# Altium PCB MCD_Board.PcbDoc (part 1 of 2)
Units mil, origin at the board's own origin, x right, y up, seen from the top; angles counter-clockwise.
Board outline 1574.8 x 1574.8 mil, 2 copper layers (Top Layer, Bottom Layer); 91 components, 65 nets, 283 pads, 76 vias.
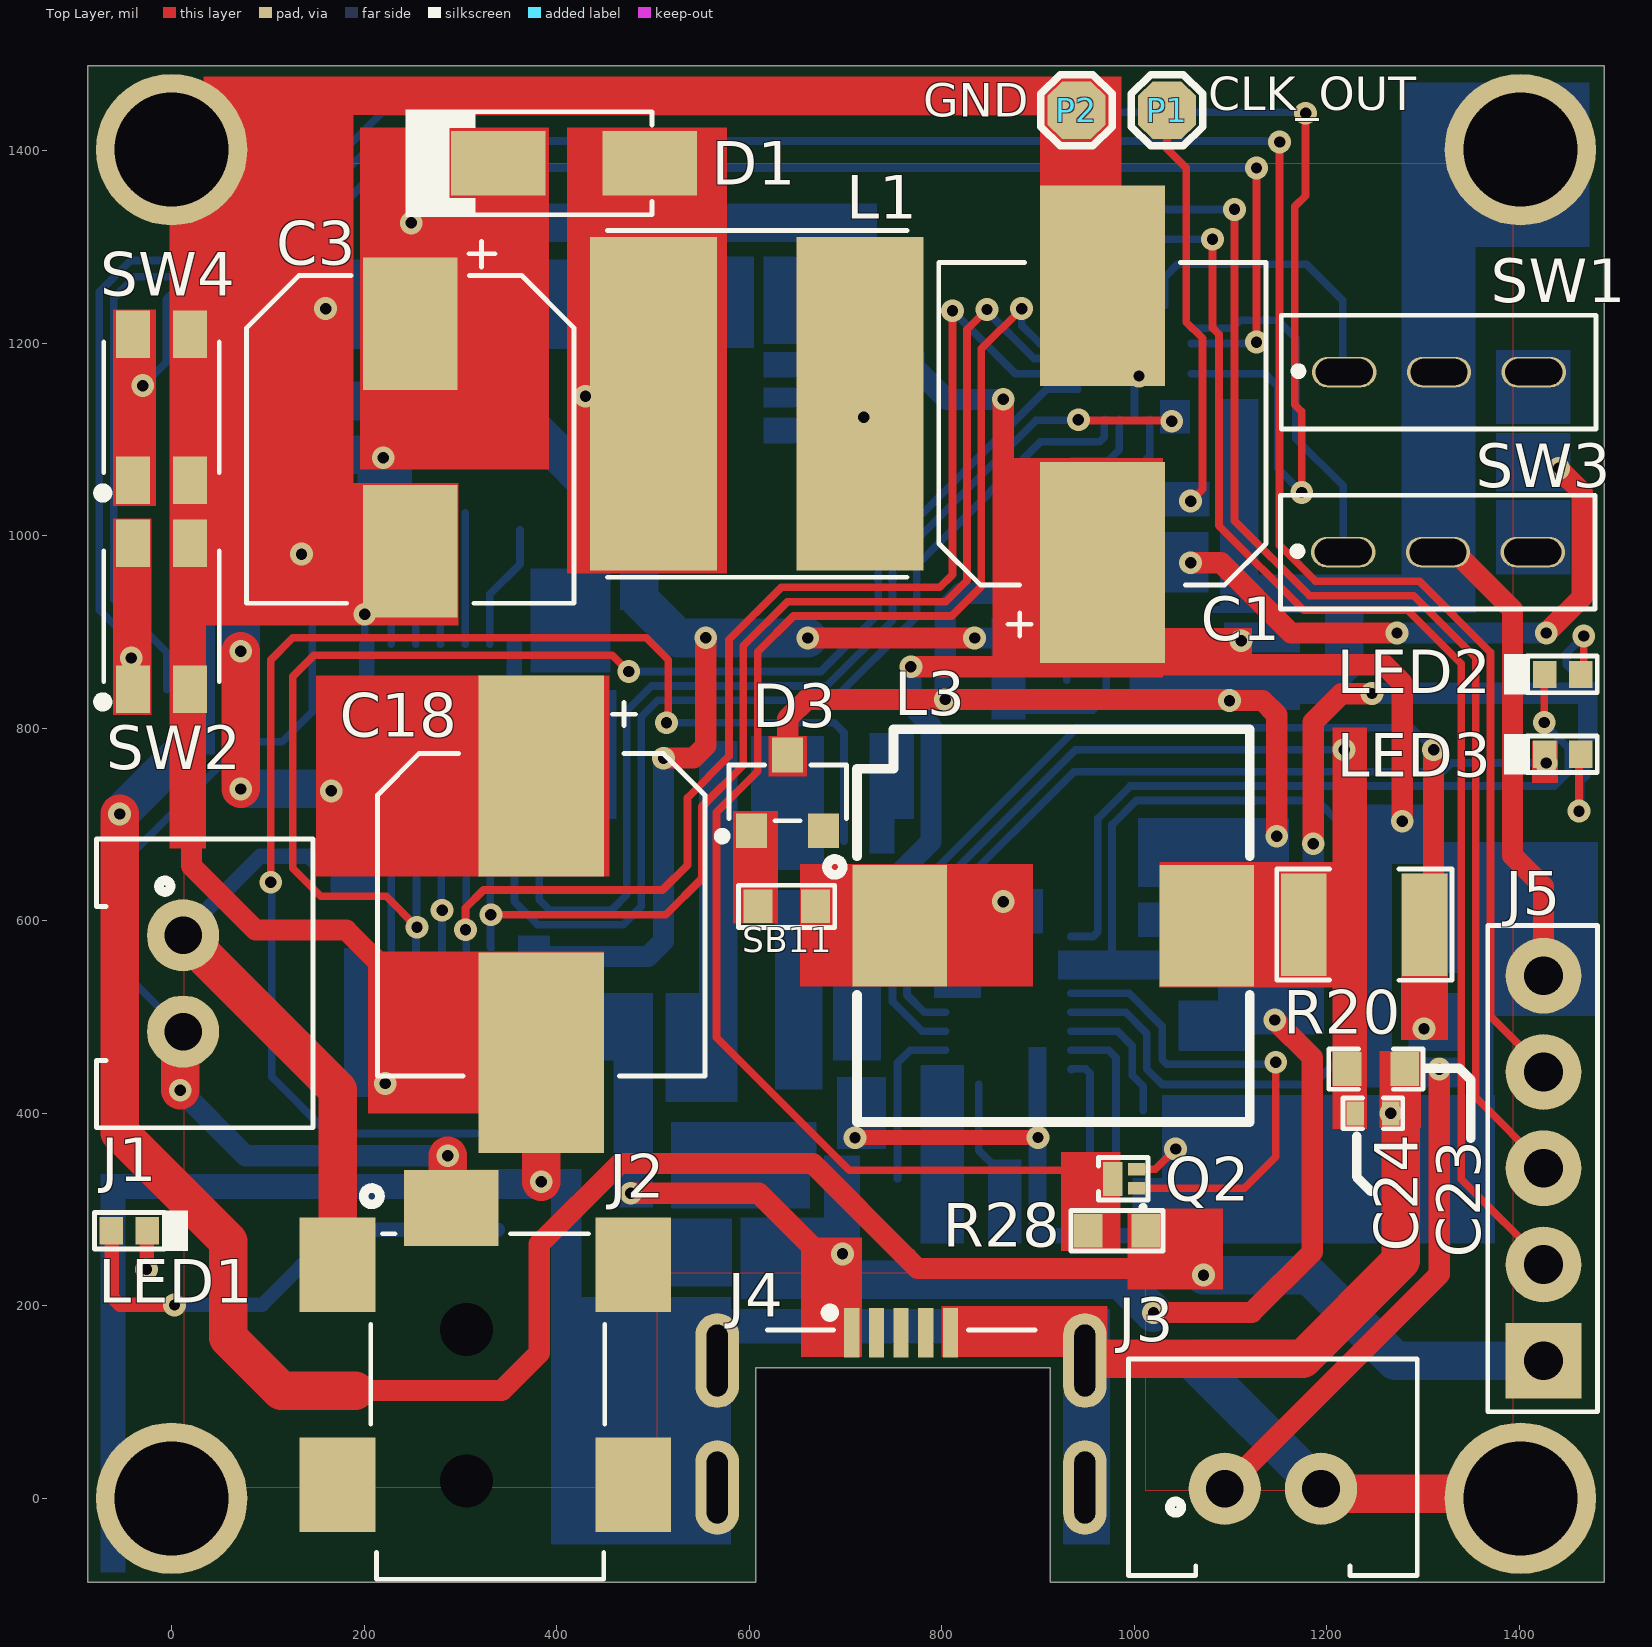
[diagram p0: Top Layer view]
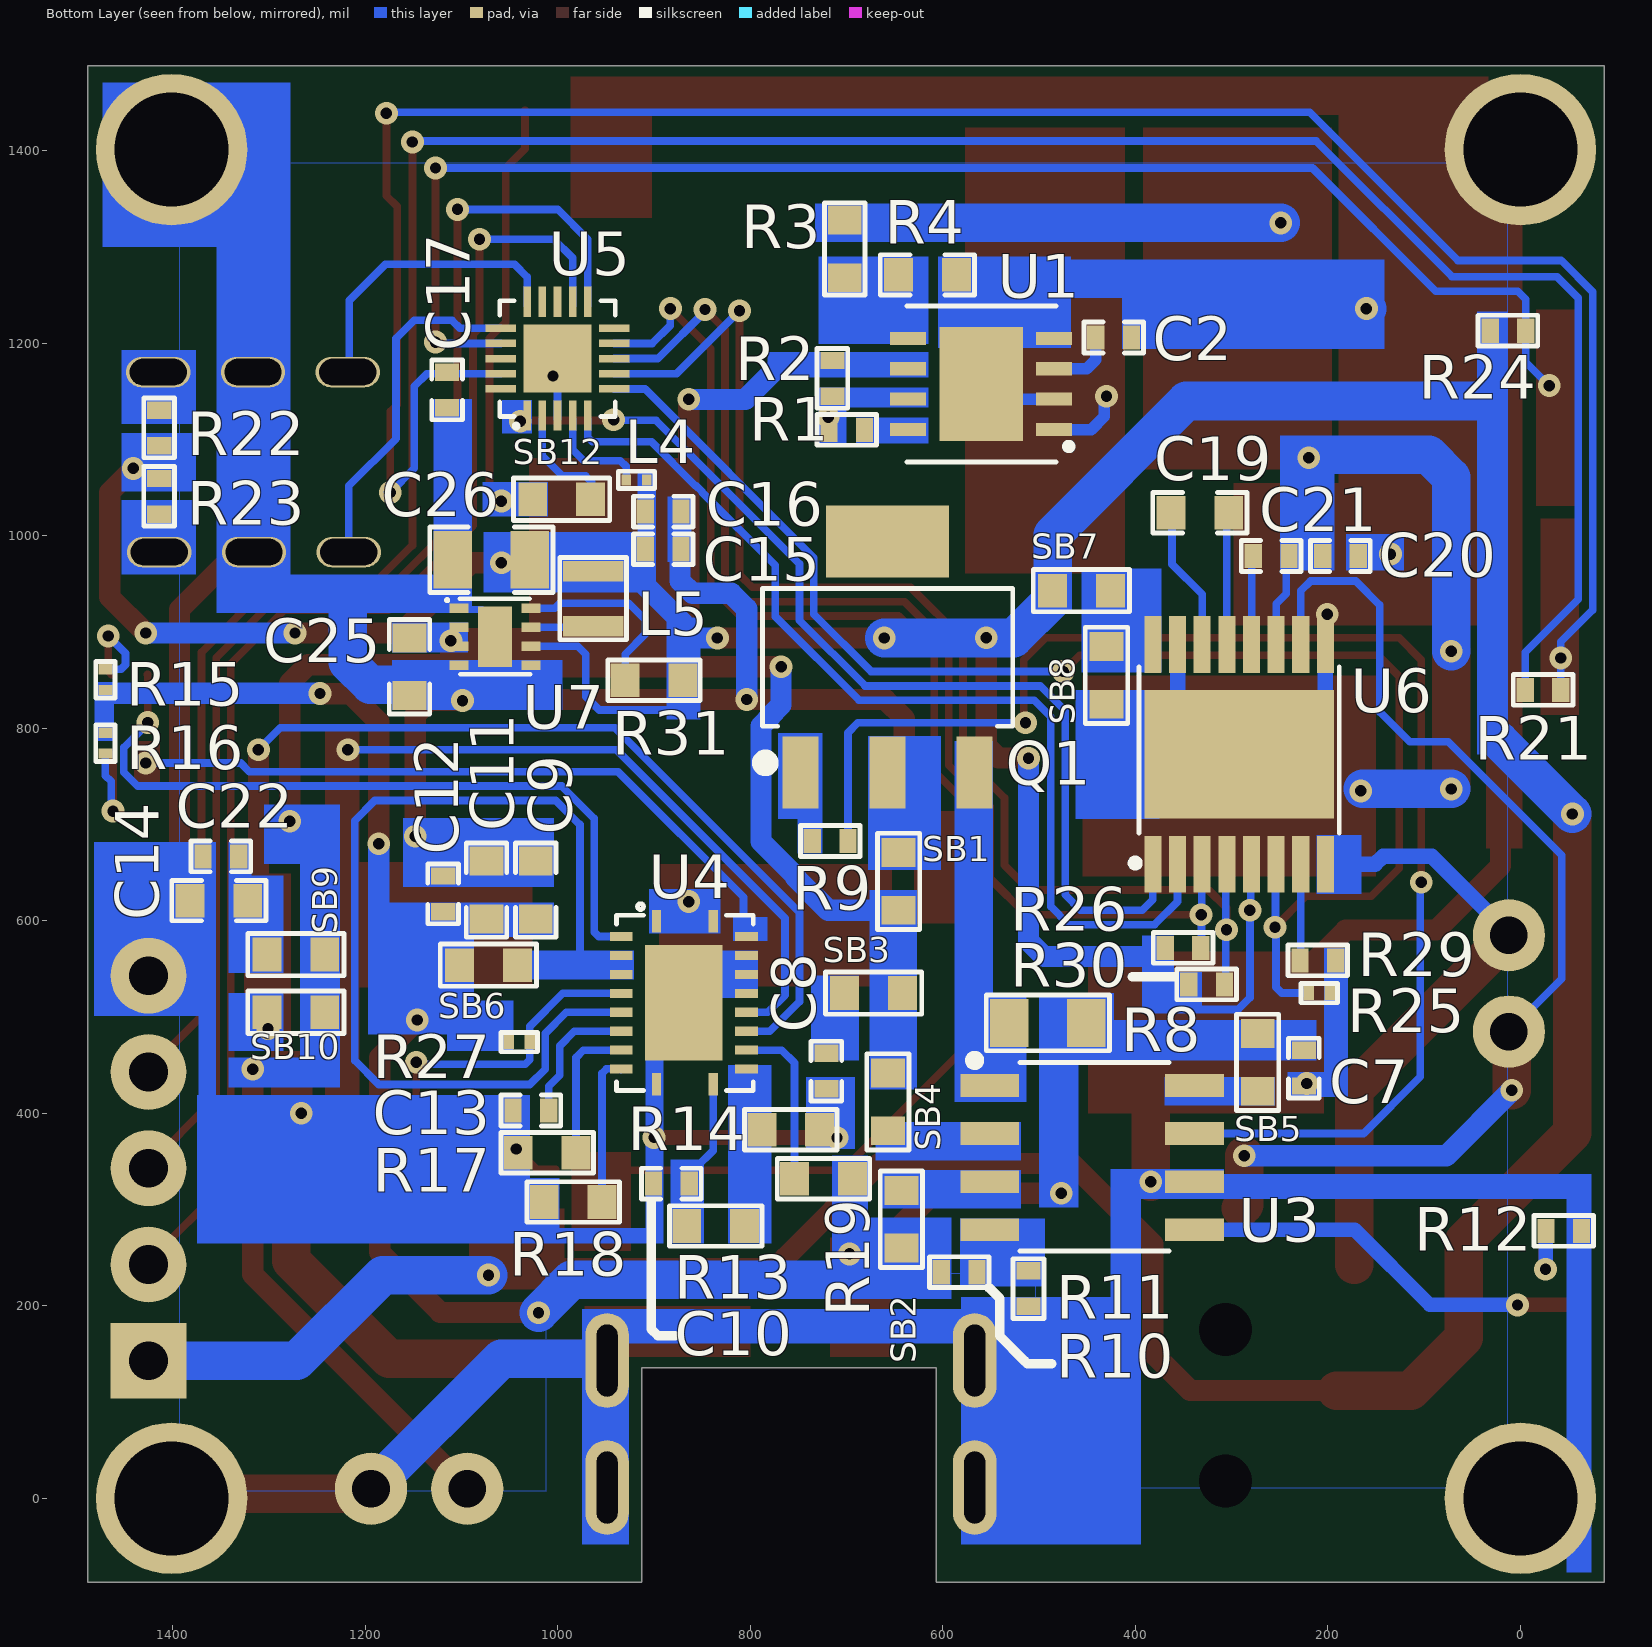
[diagram p1: Bottom Layer view, seen from below]
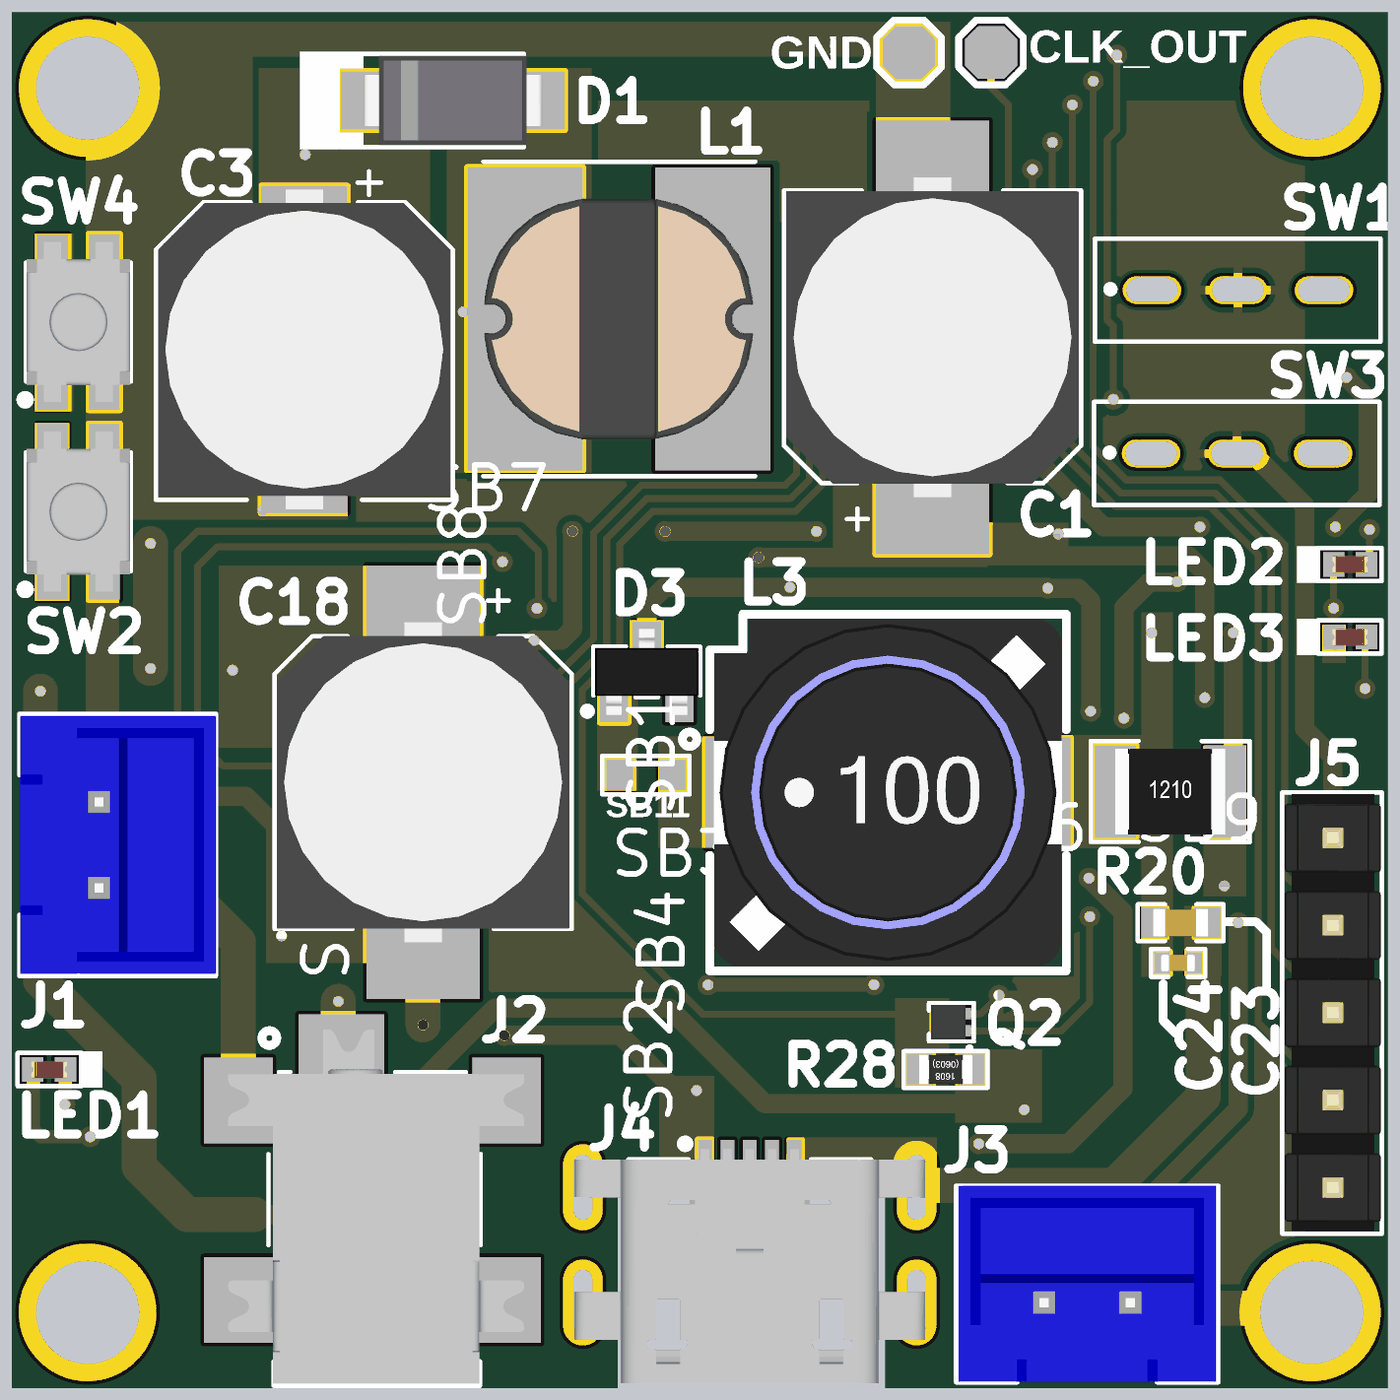
[diagram p2: 3D render of the assembled board from above, using the file's embedded part models]
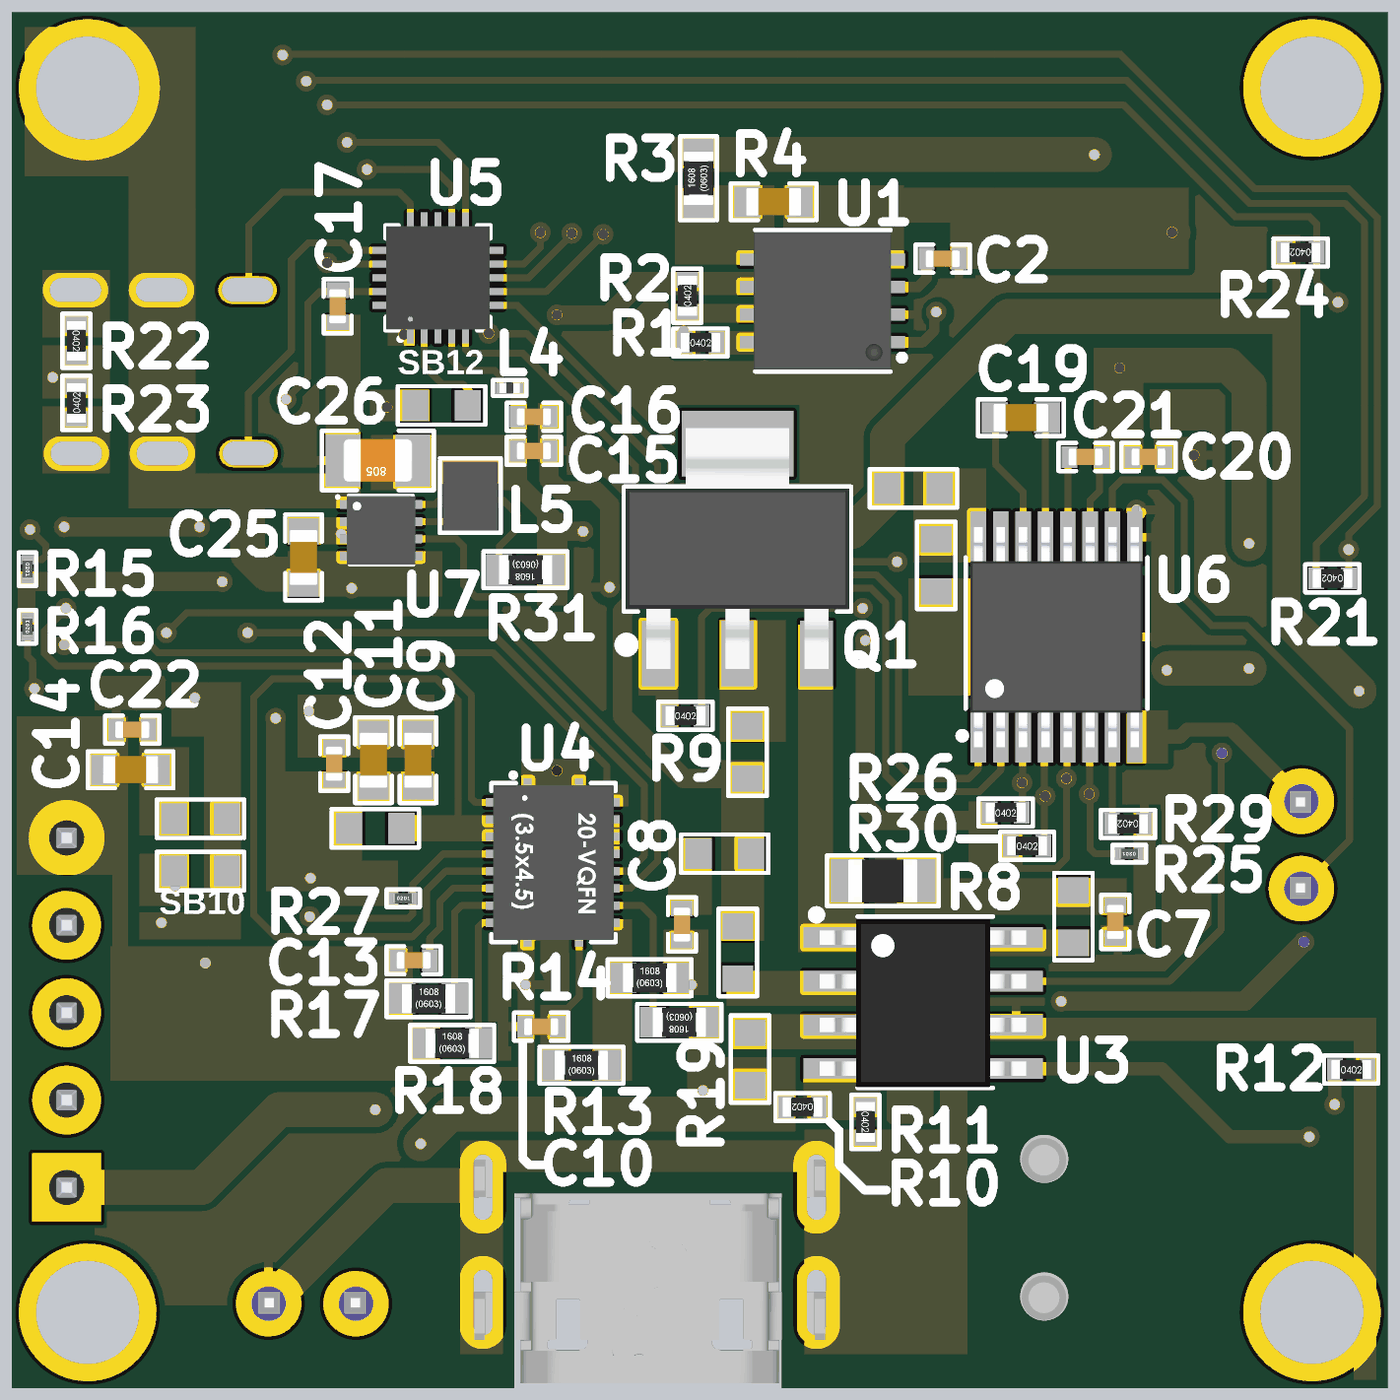
[diagram p3: 3D render of the assembled board from below, using the file's embedded part models]

## Layer stack, top to bottom
Top Solder: solder mask 0.4, Solder Resist, Dk 3.5
Top Layer: signal copper 1.4
Dielectric 1: dielectric 12.6, FR-4, Dk 4.8
Bottom Layer: signal copper 1.4
Bottom Solder: solder mask 0.4, Solder Resist, Dk 3.5

## Board outline
-86.8,-86.8 -86.8,1488 1488,1488 1488,-86.8 913,-86.8 913,136 607,136 607,-86.8

## Design rules (kind name [scope] priority, off if disabled: settings)
Clearance [All] p1: gap=7 ignorepadtopadclearanceinfootprint=FALSE except(0: Arc-Hole Track-Hole SMDPad-Hole THPad-Hole Via-Hole Fill-Hole Poly-Hole Region-Hole Text-Hole; 4: Arc-SMDPad Track-SMDPad SMDPad-SMDPad)
HoleSize [All] p1: absolutevalues=TRUE maxlimit=1000 minlimit=1 maxpercent=80.000 minpercent=20.000
HoleToHoleClearance [All] p1: gap=0 allowstackedmicrovias=TRUE
MinimumSolderMaskSliver [All] p1: minsoldermaskwidth=0
PolygonConnect [All] p1: connectstyle=Relief reliefconductorwidth=10 reliefentries=4 polygonreliefangle="90 Angle" airgapwidth=10
RoutingVias [All] p1: holewidth=11.81 width=23.62 viastyle="Through Hole" minholewidth=11.81 minwidth=23.62 maxholewidth=11.81 maxwidth=23.62
SilkToSilkClearance [All] p1: silktosilkclearance=0
SilkToSolderMaskClearance [IsPad] p1: minsilkscreentomaskgap=0 clearancetoexposedcopper=TRUE
SolderMaskExpansion [All] p1: expansion=4 istentingtop=FALSE
Width [All] p1: maxlimit=40 minlimit=8 preferedwidth=22
25 further rules are at their usual default settings.

## Classes and differential pairs
component class U_Power_Sheet: 3 C1 C2 C3 C25 C26 D1 L1 L5 R1 R2 R3 R4 R31 U1 U7
component class U_Motor_Driver_Sheet: C18 C19 C20 C21 J1 J2 R25 R26 R29 R30 SB7 SB8 U6
component class U_Controller_Sheet: 3 C15 C16 C17 L4 P1 P2 R21 R22 R23 R24 SB12 SW1 SW2 SW3 SW4 U5
component class U_Connector_Sheet: J3 J4 J5
component class U_Battery_Charging_Sheet: C7 C8 C9 C10 C11 C12 C13 C14 C22 C23 C24 D3 L3 LED1 LED2 LED3 Q1 Q2 R8 R9 R10 R11 R12 R13 R14 R15 R16 R17 R18 R19 R20 R27 R28 SB1 SB2 SB3 SB4 SB5 SB6 SB9 SB10 SB11 U3 U4

## Components (designator, comment, footprint, x,y, rotation, side; value= is the part's Value field where it differs from the comment)
C1 "100uF" UWX1E101MCL1GB 967,1116 r90 top
C2 "1500pF" "Cap 0402"#1 422.5,1206 r0 bottom
C3 "330uF" UWT1E331MNL1GS 248,1102 r270 top
C7 "0.1uF" "Cap 0402"#2 225,447 r270 bottom
C8 "0.1uF" "Cap 0402"#1 721,444 r270 bottom
C9 "10uF" "Cap 0603" 1023,632 r90 bottom
C10 "0.1uF" "Cap 0402"#1 882,327 r0 bottom
C11 "10uF" "Cap 0603" 1074,632 r90 bottom
C12 "0.1uF" "Cap 0402"#1 1119,628 r90 bottom
C13 "0.1uF" "Cap 0402"#1 1028,403 r180 bottom
C14 "10uF" "Cap 0603" 1352,621 r0 bottom
C15 "0.1uF" "Cap 0402"#1 890.5,986 r180 bottom
C16 "1uF" "Cap 0402"#1 890.5,1025 r180 bottom
C17 "0.1uF" "Cap 0402"#1 1115,1151.5 r270 bottom
C18 "100uF" UWX1E101MCL1GB 384,606.7 r270 top
C19 "22nF" "Cap 0603" 333,1024 r0 bottom
C20 "0.1uF" "Cap 0402"#1 187,979 r180 bottom
C21 "0.1uF" "Cap 0402"#1 259,979 r0 bottom
C22 "0.1uF" "Cap 0402"#1 1350,667 r0 bottom
C23 "10uF" "Cap 0603" 1251,446 r180 top
C24 "0.1uF" "Cap 0402"#2 1248,400 r180 top
C25 "10uF" "Cap 0603" 1154,864 r270 bottom
C26 "22uF" Cap0805 1069,975 r0 bottom
D1 "SS24A" SMA 418,1387 r0 top
D3 "MMBZ18VALT1G" SOT-23-3 640,733 r0 top
J1 "JST Connector" "JST Connector" 12,585 r270 top
J2 "DC-0920-SMT" DC-0920-SMT 326,158 r90 top
J3 "JST Connector" "JST Connector" 1094,10 r0 top
J4 "MU-109-ARY" MU-109-ARY 757.82,172 r0 top
J5 "PZ254V-11-05P" PZ254V-11-05P 1425.2,343 r90 top
L1 "180uH" SCD0705T-181K-N 608,1137 r0 top
L3 "10uH" SLF10145T-100M2R5-PF 916,595 r0 top
L4 "MMZ0603S601CT000" "IND 0201" 918.17,1058 r0 bottom
L5 "2.2uH" MCS20FC-2R2MMP 963,934.54 r90 bottom
LED1 "TJ-S1005SW4TGLC2R-A5" "LED 0402" -44,278 r0 top
LED2 "TJ-S1005SW4TGLC2R-A5" "LED 0402" 1444.9,856 r180 top
LED3 "TJ-S1005SW4TGLC2R-A5" "LED 0402" 1444.9,773 r180 top
P1 "TEST POINT" "TEST POINT" 1034,1442 r180 top
P2 "TEST POINT" "TEST POINT" 940,1442 r180 top
Q1 "NZT660A" NZT660A 657.45,874.08 r180 bottom
Q2 "DMN1045UFR4-7" DMN1045UFR4-7 990,332 r90 top
R1 "180R" Res0402#1 699.8,1110 r180 bottom
R2 "0.22R" Res0402#1 714.8,1163.5 r90 bottom
R3 "40K2" Res0603 702,1298 r270 bottom
R4 "2K2" "Cap 0603" 616,1271 r0 bottom
R8 "0.068R" "RES 0805" 491,494 r180 bottom
R9 "1K" Res0402#2 717,683 r180 bottom
R10 "1M" Res0402#2 583,235 r0 bottom
R11 "1M" Res0402#2 511,218 r270 bottom
R12 "2K" Res0402#1 -45,278 r180 bottom
R13 "9.31K" Res0603 836,283 r0 bottom
R14 "442K" Res0603 758,383 r0 bottom
R15 "1.5K" Res-0201 1470,850.56 r270 bottom
R16 "1.5K" Res-0201 1470,784.63 r90 bottom
R17 "5K1" Res0603 1011,359 r0 bottom
R18 "7K5" Res0603 984,308 r0 bottom
R19 "10K" Res0603 724,332 r180 bottom
R20 "0R1" "RES 1210" 1239,596 r0 top
R21 "4.7K" Res0402#1 -23.5,840 r0 bottom
R22 "10K" Res0402#2 1414,1112 r270 bottom
R23 "10K" Res0402#1 1414,1041 r90 bottom
R24 "10K" Res0402#1 13,1213 r0 bottom
R25 "1.5K" Res-0201 209,525 r0 bottom
R26 "10K" Res0402#1 350.5,572 r180 bottom
R27 "1.5K" Res-0201 1040,474 r180 bottom
R28 "10K" Res0603 982,278 r0 top
R29 "20K" Res0402#1 210.5,559 r0 bottom
R30 "10K" Res0402#1 326,534 r180 bottom
R31 "100K" Res0603 900,850 r180 bottom
SB1 "Solder Bridge" "Solder Bridge" 646,641 r270 bottom
SB2 "Solder Bridge" "Solder Bridge" 643,290 r90 bottom
SB3 "Solder Bridge" "Solder Bridge" 672,525 r0 bottom
SB4 "Solder Bridge" "Solder Bridge" 657,412 r270 bottom
SB5 "Solder Bridge" "Solder Bridge" 273,453 r270 bottom
SB6 "Solder Bridge" "Solder Bridge" 1072,554 r180 bottom
SB7 "Solder Bridge" "Solder Bridge" 456,943 r0 bottom
SB8 "Solder Bridge" "Solder Bridge" 430,855 r270 bottom
SB9 "Solder Bridge" "Solder Bridge" 1272,565 r0 bottom
SB10 "Solder Bridge" "Solder Bridge" 1272,505 r180 bottom
SB11 "Solder Bridge" "Solder Bridge" 639,615 r180 top
SB12 "Solder Bridge" "Solder Bridge" 996,1038 r0 bottom
SW1 "DS037-00P-60" DS037-00P-60 1316.57,1170 r0 top
SW2 "TS-1185EC-C-D-B" TS-1185EC-C-D-B -10.47,916.41 r90 top
SW3 "DS037-00P-60" DS037-00P-60 1315.57,983 r0 top
SW4 "TS-1185EC-C-D-B" TS-1185EC-C-D-B -10.47,1133.41 r90 top
U1 "MC33063ADRJR" MC33063ADRJR 560.21,1157.75 r0 bottom
U3 "BQ2057WSNTR" BQ2057WSNTR 445,354 r180 bottom
U4 "BQ24103ARHLR" BQ24103ARHLR 869.04,514.84 r180 bottom
U5 "ATTINY1616-MNR" 20-QFN 1000.25,1184.06 r90 bottom
U6 "DRV8876PWPR" 16HTSSOP 292.2,773 r90 bottom
U7 "TPS62162DSGR" "8-WSON (2x2)" 1065.4,895.16 r180 bottom

## Footprints (in the part's own frame and the unit in brackets; to place one, negate y for a bottom-side part, rotate by r counter-clockwise, add the part's x,y. Pads: shape width x height; smd on the part's side, far side on the other; paste and mask are expansions set on the pad)
"8-WSON (2x2)" [mm] "IC REG BUCK 3.3V 1A 8WSON"
  rect 0.5x0.25 smd: 1(-0.95,0.75) 2(-0.95,0.25) 3(-0.95,-0.25) 4(-0.95,-0.75) 5(0.95,-0.75) 6(0.95,-0.25) 7(0.95,0.25) 8(0.95,0.75)
  rect 0.9x1.6 smd: 9(0,0)
  silkscreen extent -1.28,-0.99 0.93,1, body extent -1,-1 1,1, height 0.8
16HTSSOP [mm]
  rect 1.5x0.45 smd: 1(-2.9,2.275) 2(-2.9,1.625) 3(-2.9,0.975) 4(-2.9,0.325) 5(-2.9,-0.325) 6(-2.9,-0.975) 7(-2.9,-1.625) 8(-2.9,-2.275) 9(2.9,-2.275) 10(2.9,-1.625) 11(2.9,-0.975) 12(2.9,-0.325) 13(2.9,0.325) 14(2.9,0.975) 15(2.9,1.625) 16(2.9,2.275)
  rect 3.4x5 smd: 17(0,0)
  silkscreen extent -2.94,-2.64 2.31,2.82, body extent -3.2,-2.5 3.2,2.5, height 1.2
20-QFN [mm] "IC MCU 8BIT 16KB FLASH 20VQFN"
  rect 0.8x0.2 smd: 1(-1.5,0.8) 2(-1.5,0.4) 3(-1.5,0) 4(-1.5,-0.4) 5(-1.5,-0.8) 11(1.5,-0.8) 12(1.5,-0.4) 13(1.5,0) 14(1.5,0.4) 15(1.5,0.8)
  rect 0.2x0.8 smd: 6(-0.8,-1.5) 7(-0.4,-1.5) 8(0,-1.5) 9(0.4,-1.5) 10(0.8,-1.5) 16(0.8,1.5) 17(0.4,1.5) 18(0,1.5) 19(-0.4,1.5) 20(-0.8,1.5)
  rect 1.8x1.8 smd: 21(0,0)
  silkscreen extent -1.83,-1.52 1.52,1.52, body extent -1.5,-1.5 1.5,1.5, height 0.59
BQ2057WSNTR [mm]
  rect 1.55x0.6 smd: 1(-2.7,1.905) 2(-2.7,0.635) 3(-2.7,-0.635) 4(-2.7,-1.905) 5(2.7,-1.905) 6(2.7,-0.635) 7(2.7,0.635) 8(2.7,1.905)
  silkscreen extent -3.23,-2.46 2.03,2.69, body extent -3,-2.45 3,2.45, height 1.65
BQ24103ARHLR [mm]
  rect 0.24x0.6 smd: 1(-0.725,2.15) 10(-0.725,-2.15) 11(0.775,-2.15) 20(0.775,2.15)
  rect 0.6x0.24 smd: 2(-1.65,1.75) 3(-1.65,1.25) 4(-1.65,0.75) 5(-1.65,0.25) 6(-1.65,-0.25) 7(-1.65,-0.75) 8(-1.65,-1.25) 9(-1.65,-1.75) 12(1.65,-1.75) 13(1.65,-1.25) 14(1.65,-0.75) 15(1.65,-0.25) 16(1.65,0.25) 17(1.65,0.75) 18(1.65,1.25) 19(1.65,1.75)
  rect 2.05x3.05 smd: 21(0,0)
  silkscreen extent -1.78,-2.31 1.83,2.62, body extent -1.73,-2.26 1.79,2.26, height 0.88
Cap0805 [mil] "SMD 0805"
  rect 40x60 smd mask+2.76: 1(-40,0) 2(40,0)
  silkscreen extent -64,-34 64,34, body extent -39,-25 39,25, height 30
"Cap 0402"#1 [mil]
  rect 18x25 smd mask+2.36: 1(-18.5,0) 2(18.5,0)
  silkscreen extent -31,-16 31,16, body extent -20,-10 20,10, height 19
"Cap 0402"#2 [mil]
  rect 18x25 smd: 1(-18.5,0) 2(18.5,0)
  silkscreen extent -31,-16 31,16, body extent -20,-10 20,10, height 19
"Cap 0603" [mil]
  rect 30x35 smd mask+2.36: 1(-30,0) 2(30,0)
  silkscreen extent -49,-21 49,21, body extent -32,-16 31,16, height 34
DC-0920-SMT [mm]
  rect 2.5x2 smd: 1(2.15,3.9) 2(2.15,-3.9) 4(-3.65,3.9) 5(-3.65,-3.9)
  rect 2x2.5 smd: 3(3.65,0.9)
  round 0 hole 1.4 unplated: 7(0.45,0.5) 8(-3.55,0.5)
  silkscreen extent -6.15,-3.15 4.18,3.21, body extent -6.09,-4.41 4.21,4.19, height 4.8
DMN1045UFR4-7 [mm]
  rect 0.33x0.445 smd: 1(-0.25,-0.312) 2(0.25,-0.312)
  rect 0.9x0.505 smd: 3(0,0.313)
  Top Layer region: -0.174,0.551 0.156,0.551 0.156,0.751 -0.174,0.751
  silkscreen extent -0.81,-0.62 0.56,0.69, body extent -0.5,-0.37 0.5,0.63, height 0.37
DS037-00P-60 [mm]
  oval 1.7x0.8 hole 0.7 slot 1.5 at 0 deg: 1(-2.5,0) 2(0,0) 3(2.5,0)
  silkscreen extent -4.16,-1.5 4.14,1.5
"IND 0201" [mm]
  rect 0.25x0.3 smd mask+0.055: 1(-0.275,0) 2(0.275,0)
  silkscreen extent -0.48,-0.23 0.48,0.23, body extent -0.3,-0.15 0.3,0.15, height 0.15
"JST Connector" [mil] "2 Pin JST Connector"
  round 75 hole 39: 1(0,0) 2(100,0)
  silkscreen extent -100,-90 200,135, body extent -98,-89 198,135, height 284
"LED 0402" [mm]
  rect 0.62x0.72 smd: 1(-0.475,0) 2(0.475,0)
  silkscreen extent -0.91,-0.53 1.55,0.53, body extent -0.5,-0.25 0.51,0.25, height 0.45
MC33063ADRJR [mm]
  rect 0.95x0.35 smd: 1(-1.925,1.2) 1(-1.925,1.2) 2(-1.925,0.4) 3(-1.925,-0.4) 4(-1.925,-1.2) 5(1.925,-1.2) 6(1.925,-0.4) 7(1.925,0.4) 8(1.925,1.2)
  rect 2.2x3 smd: 9(0,0)
  silkscreen extent -2.36,-2.06 1.96,2.06, body extent -2,-2 2,2, height 0.85
MCS20FC-2R2MMP [mm] "IND SMD 2.2uH 1.5A"
  rect 0.55x1.6 smd: 1(-0.725,0) 2(0.725,0)
  silkscreen extent -1.08,-0.88 1.09,0.89, body extent -1,-0.8 1,0.8, height 1
MU-109-ARY [mm]
  rect 0.4x1.3 smd: 1(-1.3,0) 2(-0.65,0) 3(0,0) 4(0.65,0) 5(1.3,0)
  oval 1.15x2.5 hole 0.55 slot 1.9 at 90 deg: MH1(-4.85,-0.73) MH2(-4.85,-4.08) MH3(4.85,-4.08) MH4(4.85,-0.73)
  Top Layer pour cut-out: -3.886,-0.838 -3.886,-6.426 3.886,-6.426 3.886,-0.838
  silkscreen extent -3.53,0.08 3.53,0.65, body extent -5.1,-6.43 5.1,0.38, height 1.81
NZT660A [mm]
  rect 0.95x1.9 smd: 1(-2.3,-3.05) 2(0,-3.05) 3(2.3,-3.05)
  rect 3.25x1.9 smd: 4(0,3.05)
  silkscreen extent -3.33,-2.9 3.3,1.8, body extent -3.25,-3.5 3.25,3.5, height 1.61
PZ254V-11-05P [mm] "Through Hole,P=2.54mm"
  rect 2x2 hole 1.02: 1(-5.08,0)
  round 2 hole 1.02: 2(-2.54,0) 3(0,0) 4(2.54,0) 5(5.08,0)
  silkscreen extent -6.43,-1.42 6.4,1.47, body extent -6.35,-1.4 6.35,1.4, height 8.5
Res0402#1 [mil]
  rect 18x25 smd mask+4: 1(-18.5,0) 2(18.5,0)
  silkscreen extent -32,-17 32,16, body extent -23,-11 23,11, height 16
Res0402#2 [mil]
  rect 18x25 smd: 1(-18.5,0) 2(18.5,0)
  silkscreen extent -32,-17 32,16, body extent -23,-11 23,11, height 16
Res0603 [mil]
  rect 30x35 smd: 1(-30,0) 2(30,0)
  silkscreen extent -48,-21 48,21, body extent -31,-17 31,17, height 18
"RES 0805" [mil] "SMD 0805"
  rect 40x50 smd: 1(-40,0) 2(40,0)
  silkscreen extent -64,-29 64,29, body extent -39,-25 39,24, height 24
"RES 1210" [mm]
  rect 1.2x2.7 smd: 1(-1.6,0) 2(1.6,0)
  silkscreen extent -2.31,-1.47 2.31,1.47, body extent -1.6,-1.25 1.6,1.25, height 0.6
Res-0201 [mm]
  rect 0.27x0.37 smd: 1(-0.275,0) 2(0.275,0)
  silkscreen extent -0.48,-0.25 0.48,0.25, body extent -0.3,-0.15 0.3,0.15, height 0.29
SCD0705T-181K-N [mm]
  rect 3.35x8.8 smd: 1(-2.725,0) 2(2.725,0)
  silkscreen extent -3.94,-4.57 3.96,4.57, body extent -3.92,-3.5 3.91,3.5, height 5.1
SLF10145T-100M2R5-PF [mm]
  rect 2.5x3.2 smd: 1(-4.05,0) 2(4.05,0)
  silkscreen extent -5.97,-5.18 5.18,5.18, body extent -5.06,-5.05 5.06,5.05, height 4.5
SMA [mm]
  rect 2.5x1.7 smd: 1(-2,0) 2(2,0)
  silkscreen extent -4.45,-1.42 2.06,1.42, body extent -2.6,-1.3 2.6,1.3, height 2.4
"Solder Bridge" [mil] "Solder Bridge ON"
  rect 30x35 smd: 1(-30,0) 2(30,0)
  silkscreen extent -50,-22 50,22
SOT-23-3 [mm] "TRANS NPN 40V 0.6A SOT23"
  rect 0.82x0.92 smd: 1(-0.95,-1) 2(0.95,-1) 3(0,1)
  silkscreen extent -1.82,-1.23 1.55,0.74, body extent -1.5,-1.25 1.5,1.25, height 1.1
"TEST POINT" [mil]
  oct 60x60 smd: 1(0,0)
  silkscreen extent -37,-37 37,37
TS-1185EC-C-D-B [mm]
  rect 1.25x0.9 smd: 1(-1.925,0.75) 1(1.925,0.75) 2(-1.925,-0.75) 2(1.925,-0.75)
  silkscreen extent -2.39,-1.52 1.73,1.68, body extent -2.33,-1.5 2.32,1.5, height 2
UWT1E331MNL1GS [mm]
  rect 3.5x2.5 smd: 1(-3,0) 2(3,0)
  silkscreen extent -5.18,-4.32 4.37,4.32, body extent -4.65,-4.25 4.65,4.25, height 10.34
UWX1E101MCL1GB [mm]
  rect 5.3x3.3 smd: 1(-3.65,0) 2(3.65,0)
  silkscreen extent -5.59,-4.32 4.27,4.32, body extent -4.65,-4.25 4.65,4.25, height 10.34

## Part data
C1 C18: library part UWX1E101MCL1GB, "CAP ALUM 100UF 20% 25V SMD", Case/Package=Radial, Dielectric Material=Aluminium, Leakage Current=3uA, Manufacturer=Nichicon, Max Operating Temperature=85°C, Min Operating Temperature=-40°C, Package Quantity=1000, Ripple Current=110mA, Supplier Part Number 1=493-2113-6-ND, Tolerance=20%, Voltage=25V, Capacitance=100uF, Category="Aluminum Electrolytic Capacitors", ComponentLink1Description=http://nichicon-us.com/english/products/pdfs/e-uwx.pdf?src-supplier=Digi-Key, ComponentLink1URL=http://nichicon-us.com/english/products/pdfs/e-uwx.pdf?src-supplier=Digi-Key, ComponentLink2Description=http://www.nichicon.co.jp/english/products/pdfs/e-ch_ref.pdf?src-supplier=Mouser, ComponentLink2URL=http://www.nichicon.co.jp/english/products/pdfs/e-ch_ref.pdf?src-supplier=Mouser, ComponentLink3Description=http://www.nichicon.co.jp/english/products/pdfs/e-wx.pdf?src-supplier=Avnet, ComponentLink3URL=http://www.nichicon.co.jp/english/products/pdfs/e-wx.pdf?src-supplier=Avnet, ComponentLink4Description=http://uk.rs-online.com/webdocs/0fa3/0900766b80fa3a90.pdf?src-supplier=RSComponents, ComponentLink4URL=http://uk.rs-online.com/webdocs/0fa3/0900766b80fa3a90.pdf?src-supplier=RSComponents, ComponentLink5Description=http://nichicon-us.com/english/products/pdfs/e-wx.pdf?src-supplier=Future+Electronics, ComponentLink5URL=http://nichicon-us.com/english/products/pdfs/e-wx.pdf?src-supplier=Future+Electronics, ComponentLink6Description=http://www.nichicon.co.jp/english/products/pdfs/e-ch_ref.pdf?src-supplier=Avnet+Europe, ComponentLink6URL=http://www.nichicon.co.jp/english/products/pdfs/e-ch_ref.pdf?src-supplier=Avnet+Europe, ComponentLink7Description=http://www.farnell.com/datasheets/2364658.pdf?src-supplier=Element14, ComponentLink7URL=http://www.farnell.com/datasheets/2364658.pdf?src-supplier=Element14, ComponentLink8Description=https://datasheet.ciiva.com/11778/0900766b80fa3a90-11778418.pdf?src-supplier=RSComponents, ComponentLink8URL=https://datasheet.ciiva.com/11778/0900766b80fa3a90-11778418.pdf?src-supplier=RSComponents, ComponentLink9Description=https://datasheet.ciiva.com/17527/e-wx-17527624.pdf?src-supplier=Avnet+Europe, ComponentLink9URL=https://datasheet.ciiva.com/17527/e-wx-17527624.pdf?src-supplier=Avnet+Europe, ComponentLink10Description=https://datasheet.ciiva.com/5361/e-wx-11809-5361100.pdf?src-supplier=Mouser, ComponentLink10URL=https://datasheet.ciiva.com/5361/e-wx-11809-5361100.pdf?src-supplier=Mouser, ComponentLink11Description=https://datasheet.ciiva.com/28458/1912851-28458684.pdf?src-supplier=Element14, ComponentLink11URL=https://datasheet.ciiva.com/28458/1912851-28458684.pdf?src-supplier=Element14, ComponentLink12Description=https://datasheet.ciiva.com/96/e-wx-96650.pdf?src-supplier=Digi-Key, ComponentLink12URL=https://datasheet.ciiva.com/96/e-wx-96650.pdf?src-supplier=Digi-Key, ComponentLink13Description=https://datasheet.ciiva.com/96/e-wx-96651.pdf?src-supplier=Digi-Key, ComponentLink13URL=https://datasheet.ciiva.com/96/e-wx-96651.pdf?src-supplier=Digi-Key, ComponentLink14Description=https://datasheet.ciiva.com/96/e-wx-96652.pdf?src-supplier=Digi-Key, ComponentLink14URL=https://datasheet.ciiva.com/96/e-wx-96652.pdf?src-supplier=Digi-Key, ComponentLink15Description=https://datasheet.ciiva.com/11687/e-wx-11687148.pdf?src-supplier=Avnet, ComponentLink15URL=https://datasheet.ciiva.com/11687/e-wx-11687148.pdf?src-supplier=Avnet, ComponentLink16Description=https://datasheet.ciiva.com/16512/e-wx-16512638.pdf?src-supplier=Future+Electronics, ComponentLink16URL=https://datasheet.ciiva.com/16512/e-wx-16512638.pdf?src-supplier=Future+Electronics, Construction=Cylindrical, Diameter=8mm, Dissipation Factor=0.14%, Height=5.4mm, Height - Seated (Max)=0.213inch, Lead Diameter=0.8mm, Lead Free="Lead Free", Lead Pitch=2.3mm, Length=5.4mm, Life (Hours)=2000Hour, Manufacturer Part Number=UWX1E101MCL1GB, Mount="Surface Mount", Number of Pins=2, Packaging="Tape and Reel", Polarity=Polar, Pricing 1="1=0.43, 10=0.301, 50=0.211, 100=0.1808, 500=0.13558 (USD)", Pricing 2="1=0.43000, 10=0.30100, 50=0.21100, 100=0.18080, 500=0.13558 (USD)", Radiation Hardening=No, REACH SVHC="No SVHC", Ripple Current (AC)=110mA, RoHS=Yes, RoHS Compliant=Yes, Series=WX, Stock 1=30613, Stock 2=25010, Supplier 1=Digi-Key, Supplier 2=Digi-Key, Supplier Part Number 2=493-2113-1-ND, Termination=SMD/SMT, Voltage Rating=25V, Voltage Rating (DC)=25V, Weight=0.01lb, Width=0.25inch
C2: library part CL05B152KB5NNNC, "CAP CER 1500PF 50V X7R 0402", Capacitance=1.5nF, Case Code (Imperial)=0402, Case Code (Metric)=1005, Dielectric=X7R, Manufacturer=Samsung, Max Operating Temperature=125°C, Min Operating Temperature=-55°C, Package Quantity=1, Supplier Part Number 1=7661526, Tolerance=10%, Voltage=50V, Case/Package=0402, Category="Ceramic Capacitors", ComponentLink1Description=https://datasheet.ciiva.com/16498/cl05b152kb5nnnc-16498493.pdf?src-supplier=Future+Electronics, ComponentLink1URL=https://datasheet.ciiva.com/16498/cl05b152kb5nnnc-16498493.pdf?src-supplier=Future+Electronics, ComponentLink2Description=https://datasheet.ciiva.com/15195/getdatasheetpartid-543173-15195639.pdf?src-supplier=Verical, ComponentLink2URL=https://datasheet.ciiva.com/15195/getdatasheetpartid-543173-15195639.pdf?src-supplier=Verical, ComponentLink3Description=https://datasheet.ciiva.com/29198/459134-da-01-en-vs-kondensator-0402-29198336.pdf?src-supplier=Conrad, ComponentLink3URL=https://datasheet.ciiva.com/29198/459134-da-01-en-vs-kondensator-0402-29198336.pdf?src-supplier=Conrad, ComponentLink4Description=https://datasheet.ciiva.com/26309/mlcc-catalogdownload2013-eng-26309021.pdf?src-supplier=Distrelec, ComponentLink4URL=https://datasheet.ciiva.com/26309/mlcc-catalogdownload2013-eng-26309021.pdf?src-supplier=Distrelec, Construction=Flat, Contact Plating=Tin, Depth=0.5mm, Height=0.5mm, Length=1mm, Manufacturer Part Number=CL05B152KB5NNNC, Material=Ceramic, Mount="Surface Mount", Packaging="Tape and Reel", Pricing 1="10000=0.00400, 30000=0.00400, 50000=0.00400, 100000=0.00300, 250000=0.00300 (USD)", Radiation Hardening=No, RoHS=Yes, RoHS Compliant=Yes, Series=CL, Stock 1=20000, Supplier 1=RSComponents, Thickness=0.022inch, Voltage Rating=50V, Width=0.02inch
C3: library part UWT1E331MNL1GS, "CAP ALUM 330UF 20% 25V SMD", Case/Package=Radial, Dielectric Material=Aluminium, Leakage Current=3uA, Manufacturer=Nichicon, Max Operating Temperature=105°C, Min Operating Temperature=-55°C, Package Quantity=500, Ripple Current=190mA, Supplier Part Number 1=58R3568, Tolerance=20%, Voltage=25V, Capacitance=330uF, Category="Aluminum Electrolytic Capacitors", ComponentLink1Description=https://datasheet.ciiva.com/97/e-wt-97107.pdf?src-supplier=Digi-Key, ComponentLink1URL=https://datasheet.ciiva.com/97/e-wt-97107.pdf?src-supplier=Digi-Key, ComponentLink2Description=https://datasheet.ciiva.com/30522/getdatasheetpartid-457641-30522227.pdf?src-supplier=Verical, ComponentLink2URL=https://datasheet.ciiva.com/30522/getdatasheetpartid-457641-30522227.pdf?src-supplier=Verical, ComponentLink3Description=https://datasheet.ciiva.com/97/e-wt-97108.pdf?src-supplier=Digi-Key, ComponentLink3URL=https://datasheet.ciiva.com/97/e-wt-97108.pdf?src-supplier=Digi-Key, ComponentLink4Description=https://datasheet.ciiva.com/97/e-wt-97109.pdf?src-supplier=Digi-Key, ComponentLink4URL=https://datasheet.ciiva.com/97/e-wt-97109.pdf?src-supplier=Digi-Key, ComponentLink5Description=https://datasheet.ciiva.com/11782/0900766b80649b51-11782007.pdf?src-supplier=RSComponents, ComponentLink5URL=https://datasheet.ciiva.com/11782/0900766b80649b51-11782007.pdf?src-supplier=RSComponents, ComponentLink6Description=https://datasheet.ciiva.com/11686/e-wt-11686502.pdf?src-supplier=Avnet, ComponentLink6URL=https://datasheet.ciiva.com/11686/e-wt-11686502.pdf?src-supplier=Avnet, ComponentLink7Description=https://datasheet.ciiva.com/16502/e-wt-16502936.pdf?src-supplier=Future+Electronics, ComponentLink7URL=https://datasheet.ciiva.com/16502/e-wt-16502936.pdf?src-supplier=Future+Electronics, ComponentLink8Description=https://datasheet.ciiva.com/7851/e-wt-7851757.pdf?src-supplier=Element14, ComponentLink8URL=https://datasheet.ciiva.com/7851/e-wt-7851757.pdf?src-supplier=Element14, Construction=Cylindrical, Diameter=8mm, Dissipation Factor=0.16%, Height=10mm, Height - Seated (Max)=0.394inch, Lead Free="Lead Free", Length=10mm, Life (Hours)=1000Hour, Manufacturer Part Number=UWT1E331MNL1GS, Mount="Surface Mount,PCB", Number of Pins=2, Packaging="Tape and Reel", Pricing 1="1=0.75000, 10=0.53800, 25=0.47600, 50=0.41500, 100=0.35400 (USD)", Radiation Hardening=No, REACH SVHC="No SVHC", Ripple Current (AC)=190mA, RoHS=Yes, RoHS Compliant=Yes, Series=WT, Supplier 1=Newark, Termination=SMD/SMT, Voltage Rating=25V, Voltage Rating (DC)=25V
C7 C8 C10 C12 C13 C15 C17 C20 C21 C22 C24: library part CC0402KRX7R7BB104, "CAP CER 0.1UF 16V X7R 0402", Capacitance=100nF, Case Code (Imperial)=0402, Case Code (Metric)=1005, Dielectric=X7R, Manufacturer=Yageo, Max Operating Temperature=125°C, Min Operating Temperature=-55°C, Package Quantity=1, Supplier Part Number 1=311-1338-1-ND, Tolerance=10%, Voltage=16V, Case/Package=0402, ComponentLink1Description=http://www.yageo.com/documents/recent/UPY-GPHC_X7R_6.3V-to-50V_8.pdf?src-supplier=Avnet+Europe, ComponentLink1URL=http://www.yageo.com/documents/recent/UPY-GPHC_X7R_6.3V-to-50V_8.pdf?src-supplier=Avnet+Europe, ComponentLink2Description=http://www.yageo.com/documents/recent/UPY-GPHC_X7R_6.3V-to-50V_18.pdf?src-supplier=Digi-Key, ComponentLink2URL=http://www.yageo.com/documents/recent/UPY-GPHC_X7R_6.3V-to-50V_18.pdf?src-supplier=Digi-Key, ComponentLink3Description=http://www.yageo.com/documents/recent/UPY-GPHC_X7R_6.3V-to-50V_8.pdf?src-supplier=Avnet, ComponentLink3URL=http://www.yageo.com/documents/recent/UPY-GPHC_X7R_6.3V-to-50V_8.pdf?src-supplier=Avnet, ComponentLink4Description=http://www.yageo.com/documents/recent/UPY-GPHC_X7R_6.3V-to-50V_18.pdf?src-supplier=Mouser, ComponentLink4URL=http://www.yageo.com/documents/recent/UPY-GPHC_X7R_6.3V-to-50V_18.pdf?src-supplier=Mouser, ComponentLink5Description=http://www.farnell.com/datasheets/2167236.pdf?src-supplier=Element14, ComponentLink5URL=http://www.farnell.com/datasheets/2167236.pdf?src-supplier=Element14, ComponentLink6Description=http://www.farnell.com/datasheets/1489800.pdf?src-supplier=Element14, ComponentLink6URL=http://www.farnell.com/datasheets/1489800.pdf?src-supplier=Element14, Composition=Ceramic, Depth=0.5mm, Halogen Free="Halogen Free", Height=0.5mm, Lead Free="Lead Free", Length=1mm, Manufacturer Part Number=CC0402KRX7R7BB104, Mount="Surface Mount", Number of Pins=2, Packaging="Tape and Reel", Pricing 1="1=0.1, 10=0.034, 100=0.015, 500=0.0107, 1000=0.00841, 2500=0.00764, 5000=0.00703 (USD)", Radiation Hardening=No, REACH SVHC="No SVHC", Stock 1=16982736, Supplier 1=Digi-Key, Termination=SMD/SMT, Thickness=0.022inch, Voltage Rating=16V, Voltage Rating (DC)=16V, Width=0.02inch
C9 C11 C14 C23 C25: library part CL10A106MA8NRNC, "CAP CER 10UF 25V X5R 0603", Case Code (Imperial)=0603, Case Code (Metric)=1608, Dielectric=X5R, Manufacturer=Samsung, Max Operating Temperature=85°C, Min Operating Temperature=-55°C, Package Quantity=1, Tolerance=20%, Voltage Rating=25V, Capacitance=10uF, Case/Package=0603, Category="Ceramic Capacitors", ComponentLink1Description=https://datasheet.ciiva.com/25766/cl10a106ma8nrnc-25766562.pdf?src-supplier=Digi-Key, ComponentLink1URL=https://datasheet.ciiva.com/25766/cl10a106ma8nrnc-25766562.pdf?src-supplier=Digi-Key, Construction=Flat, Contact Plating=Tin, Lead Free="Lead Free", Length=0.063inch, Manufacturer Part Number=CL10A106MA8NRNC, Mount="Surface Mount", Packaging="Tape and Reel", Pricing 1="4000=0.03753, 8000=0.03700, 16000=0.03595, 24000=0.03515, 32000=0.03383, 40000=0.03304, 400000=0.03225 (USD)", RoHS=Yes, RoHS Compliant=Yes, Series=CL, Supplier 1=Avnet, Supplier Part Number 1=CL10A106MA8NRNC, Termination=Wraparound, Thickness=0.035inch, Width=0.031inch
C16: library part GRM155R61E105KA12D, "CAP CER 1UF 25V X5R 0402", Case Code (Imperial)=0402, Case Code (Metric)=1005, Dielectric=X5R, Manufacturer=Murata, Max Operating Temperature=85°C, Min Operating Temperature=-55°C, Package Quantity=10000, Supplier Part Number 1=490-10017-1-ND, Tolerance=10%, Voltage=25V, Capacitance=1uF, Case/Package=0402, ComponentLink1Description=http://www.farnell.com/datasheets/2048341.pdf?src-supplier=Element14, ComponentLink1URL=http://www.farnell.com/datasheets/2048341.pdf?src-supplier=Element14, Depth=0.5mm, Height=0.5mm, Lead Free="Lead Free", Length=1mm, Manufacturer Part Number=GRM155R61E105KA12D, Material=Ceramic, Mount="Surface Mount", Packaging="Tape and Reel", Pricing 1="1=0.11, 10=0.077, 100=0.0363, 500=0.02546, 1000=0.02108, 2500=0.01962, 5000=0.01795 (USD)", REACH SVHC="No SVHC", Stock 1=1194305, Supplier 1=Digi-Key, Termination=SMD/SMT, Thickness=0.022inch, Voltage Rating=25V, Voltage Rating (DC)=25V, Weight=0.000212oz, Width=0.5mm
C19: library part CGA3E2X7R2A223K080AA, "CAP CER 0.022UF 100V X7R 0603", Case Code (Imperial)=0603, Case Code (Metric)=1608, Dielectric=X7R, Manufacturer=TDK, Max Operating Temperature=125°C, Min Operating Temperature=-55°C, Package Quantity=1, Ratings=AEC-Q200, Resistor Type=Ceramic, Supplier Part Number 1=445-5814-1-ND, Tolerance=10%, Voltage Rating=100V, Capacitance=22nF, Case/Package=0603, Category="Ceramic Capacitors", ComponentLink1Description=https://datasheet.ciiva.com/22725/1735406-22725648.pdf?src-supplier=Element14, ComponentLink1URL=https://datasheet.ciiva.com/22725/1735406-22725648.pdf?src-supplier=Element14, ComponentLink2Description=https://datasheet.ciiva.com/24218/cga3e2x7r2a223k080aa-266292-24218959.pdf?src-supplier=Mouser, ComponentLink2URL=https://datasheet.ciiva.com/24218/cga3e2x7r2a223k080aa-266292-24218959.pdf?src-supplier=Mouser, ComponentLink3Description=https://datasheet.ciiva.com/7975/1807242-7975349.pdf?src-supplier=Element14, ComponentLink3URL=https://datasheet.ciiva.com/7975/1807242-7975349.pdf?src-supplier=Element14, Depth=0.8mm, Height=0.8mm, Length=1.6mm, Manufacturer Part Number=CGA3E2X7R2A223K080AA, Mount="Surface Mount", Packaging="Tape and Reel", Pricing 1="1=0.11000, 10=0.07600, 50=0.04340, 100=0.03590, 500=0.02516, 1000=0.02083 (USD)", REACH SVHC="No SVHC", RoHS=Yes, RoHS Compliant=Yes, Series=CGA, Stock 1=56079, Supplier 1=Digi-Key, Termination=SMD/SMT, Thickness=0.035inch, Voltage Rating (DC)=100V, Weight=7.1E-05oz, Width=0.031inch
C26: library part CC0805MKX5R8BB226, "CAP CER 22UF 25V X5R 0805", Case Code (Imperial)=0805, Case Code (Metric)=2012, Dielectric=X5R, Manufacturer=Yageo, Max Operating Temperature=85°C, Min Operating Temperature=-55°C, Package Quantity=3000, Supplier Part Number 1=311-1903-1-ND, Tolerance=20%, Voltage Rating=25V, Capacitance=22uF, Case/Package=0805, Category="Ceramic Capacitors", ComponentLink1Description=http://www.mouser.com/ds/2/447/Yageo_UPY-GP_NP0_16V-to-50V_9-358835.pdf?src-supplier=Mouser, ComponentLink1URL=http://www.mouser.com/ds/2/447/Yageo_UPY-GP_NP0_16V-to-50V_9-358835.pdf?src-supplier=Mouser, ComponentLink2Description=http://www.yageo.com/documents/recent/UPY-GPHC_X5R_4V-to-50V_25.pdf?src-supplier=Digi-Key, ComponentLink2URL=http://www.yageo.com/documents/recent/UPY-GPHC_X5R_4V-to-50V_25.pdf?src-supplier=Digi-Key, Halogen Free="Halogen Free", Height=1.25mm, Lead Free="Lead Free", Length=0.079inch, Manufacturer Part Number=CC0805MKX5R8BB226, Mount="Surface Mount", Packaging="Tape and Reel", Pricing 1="1=0.47000, 10=0.33300, 50=0.25140, 100=0.21900, 500=0.16222, 1000=0.13789 (USD)", RoHS=Yes, RoHS Compliant=Yes, Stock 1=64970, Supplier 1=Digi-Key, Termination=SMD/SMT, Thickness=0.057inch, Voltage Rating (DC)=25V, Weight=0.000194oz, Width=0.049inch
D1: "40V 500mV@2A 2A SMA(DO-214AC) Schottky Barrier Diodes (SBD) ROHS", Manufacturer=Yangzhou, Package=SMA(DO-214AC), Manufacturer Part No=SS24A
D3: "ESD SMD Vr=18V Ippm=1.6A 40W 225mW", Breakdown Voltage=17.1V, Case/Package=SOT-23-3, Clamping Voltage=25V, Leakage Current=50nA, Manufacturer="ON Semiconductor", Max Breakdown Voltage=18.9V, Max Operating Temperature=150°C, Max Power Dissipation=225mW, Max Surge Current=1.6A, Min Operating Temperature=-55°C, Operating Supply Voltage=14.5V, Package Quantity=1, Peak Pulse Power=40W, Power Line Protection=No, Resistor Type=Zener, Supplier Part Number 1=7814301, Test Current=1mA, Voltage Rating (DC)=18V, Category="Zener Diodes", Clamping Voltage-Max=25V, ComponentLink1Description=https://datasheet.ciiva.com/15143/getdatasheetpartid-110231-15143507.pdf?src-supplier=Verical, ComponentLink1URL=https://datasheet.ciiva.com/15143/getdatasheetpartid-110231-15143507.pdf?src-supplier=Verical, ComponentLink2Description=https://datasheet.ciiva.com/4507/mmbz5v6alt1-d-4507882.pdf?src-supplier=Mouser, ComponentLink2URL=https://datasheet.ciiva.com/4507/mmbz5v6alt1-d-4507882.pdf?src-supplier=Mouser, ComponentLink3Description=https://datasheet.ciiva.com/3304/mmbz5v6alt1-d-3304031.pdf?src-supplier=Avnet, ComponentLink3URL=https://datasheet.ciiva.com/3304/mmbz5v6alt1-d-3304031.pdf?src-supplier=Avnet, ComponentLink4Description=https://datasheet.ciiva.com/16379/mmbz5v6alt1-d-16379322.pdf?src-supplier=Future+Electronics, ComponentLink4URL=https://datasheet.ciiva.com/16379/mmbz5v6alt1-d-16379322.pdf?src-supplier=Future+Electronics, ComponentLink5Description=https://datasheet.ciiva.com/339/mmbz5v6alt1-d-339743.pdf?src-supplier=Digi-Key, ComponentLink5URL=https://datasheet.ciiva.com/339/mmbz5v6alt1-d-339743.pdf?src-supplier=Digi-Key, ComponentLink6Description=https://datasheet.ciiva.com/339/mmbz5v6alt1-d-339744.pdf?src-supplier=Digi-Key, ComponentLink6URL=https://datasheet.ciiva.com/339/mmbz5v6alt1-d-339744.pdf?src-supplier=Digi-Key, ComponentLink7Description=https://datasheet.ciiva.com/339/mmbz5v6alt1-d-339742.pdf?src-supplier=Digi-Key, ComponentLink7URL=https://datasheet.ciiva.com/339/mmbz5v6alt1-d-339742.pdf?src-supplier=Digi-Key, Contact Plating=Tin,Matte, Depth=1.3mm, Diode Type=ZENER, Direction=Unidirectional, Element Configuration="Common Anode", ESD Protection=Yes, Height=1.01mm, Lead Free="Lead Free", Length=2.9mm, Manufacturer Part Number=MMBZ18VALT1G, Max Reverse Leakage Current=50nA, Min Breakdown Voltage=17.1V, Number of Channels=2, Number of Elements=2, Number of Pins=3, Number of Unidirectional Channels=2, Packaging="Tape and Reel", Peak Pulse Current=1.6A, Polarity=Unidirectional, Power Dissipation=40W, Pricing 1="100=0.07400, 300=0.06100, 600=0.05400, 1200=0.04600, 2400=0.04300 (USD)", Radiation Hardening=No, REACH SVHC="No SVHC", Reverse Breakdown Voltage=17.1V, Reverse Standoff Voltage=14.5V, RoHS=Yes, RoHS Compliant=Yes, Series="Automotive, AEC-Q101", Stock 1=100, Supplier 1=RSComponents, Termination=SMD/SMT, Width=1.4mm, Working Voltage=14.5V
J1 J3: library part "2 Pin JST Connector", "2 PIN JST Connector"
J2: "Surface Mount DC Power Receptacle 1.2mm 3.7mm SMD AC/DC Power Connectors ROHS", Manufacturer="XKB Connectivity", Package=Custom, ComponentLink1Description=LCSC, ComponentLink1URL=https://www.lcsc.com/product-detail/AC-span-style-background-color-ff0-DC-span-Power-Connectors_XKB-Connectivity-DC-0920-SMT_C692456.html, Manufacturer Part No=DC-0920-SMT
J4: "1.5A USB 2.0 1 Sink board 5 Female -20℃~+70℃ Micro-B SMD USB Connectors ROHS", Manufacturer=XUNPU, Package=Custom, ComponentLink1Description=LCSC, ComponentLink1URL=https://lcsc.com/product-detail/span-style-background-color-ff0-USB-span-Connectors_XUNPU-MU-109-ARY_C720609.html, Manufacturer Part No=MU-109-ARY
J5: "Pin Header 5 1 right-angle", Manufacturer=XFCN, Brand Category="Made In Asia Brands", Connector Type="Pin Header", Number of Pins=5, Number of Rows=1, Packaging=Bag-packed, Pitch=2.54
L1: library part SCD0705T-181K-N, "510mA 180uH ±10% 710mΩ SMD Power Inductors ROHS"
L3: library part SLF10145T-100M2R5-PF, "FIXED IND 10UH 2.5A 43.7 MOHM", Case/Package=Nonstandard, Current Rating=2.5A, DC Resistance (DCR)=36.4mR, Inductance Tolerance=20%, Manufacturer=TDK, Max Operating Temperature=105°C, Min Operating Temperature=-40°C, Package Quantity=500, Rated Current-Max=3A, Resistor Type=Wirewound, Supplier Part Number 1=445-1975-6-ND, Test Frequency=1kHz, ComponentLink1Description=http://www.farnell.com/datasheets/1838969.pdf?src-supplier=Element14, ComponentLink1URL=http://www.farnell.com/datasheets/1838969.pdf?src-supplier=Element14, ComponentLink2Description=http://uk.rs-online.com/webdocs/14e9/0900766b814e91a9.pdf?src-supplier=RSComponents, ComponentLink2URL=http://uk.rs-online.com/webdocs/14e9/0900766b814e91a9.pdf?src-supplier=RSComponents, ComponentLink3Description=http://components.arrow.com/part/dataview/42010891S8914805N1165?src-supplier=Arrow+Electronics, ComponentLink3URL=http://components.arrow.com/part/dataview/42010891S8914805N1165?src-supplier=Arrow+Electronics, ComponentLink4Description=http://datasheet.iiic.cc/tdk/SLF10145T-100M2R5-PF.pdf?src-supplier=IIIC, ComponentLink4URL=http://datasheet.iiic.cc/tdk/SLF10145T-100M2R5-PF.pdf?src-supplier=IIIC, Core Material=Ferrite, DC Current=2.5A, Depth=10.4mm, Height=4.5mm, Height - Seated (Max)=0.189inch, Inductance=10uH, Lead Free="Lead Free", Length=10.1mm, Manufacturer Part Number=SLF10145T-100M2R5-PF, Max DC Current=2.5A, Military Standard=Not, Mount="Surface Mount", Number of Pins=2, Packaging="Tape and Reel", Pricing 1="1=1.05, 10=0.975, 25=0.9, 50=0.75, 100=0.705, 250=0.63 (USD)", Radiation Hardening=No, REACH SVHC="No SVHC", RMS Current (Irms)=3A, RoHS Compliant=Yes, Saturation Current=3A, Series=SLF, Shielding=Shielded, Stock 1=3269, Supplier 1=Digi-Key, Termination=SMD/SMT, Tolerance=20%, Width=0.398inch
L4: "FERRITE BEAD 600 OHM 0201 1LN", Case Code (Imperial)=0201, Case Code (Metric)=0603, Current Rating=100mA, DC Resistance (DCR)=1.45R, Manufacturer=TDK, Package Quantity=15000, Supplier Part Number 1=445-2146-1-ND, Tolerance=25%, Case/Package=0201, Category=Inductors, ComponentLink1Description=https://datasheet.ciiva.com/46381/1795294-46381669.pdf?src-supplier=Element14, ComponentLink1URL=https://datasheet.ciiva.com/46381/1795294-46381669.pdf?src-supplier=Element14, ComponentLink2Description=https://datasheet.ciiva.com/46634/beads-commercial-signal-mmz-en-46634390.pdf?src-supplier=Digi-Key, ComponentLink2URL=https://datasheet.ciiva.com/46634/beads-commercial-signal-mmz-en-46634390.pdf?src-supplier=Digi-Key, ComponentLink3Description=https://datasheet.ciiva.com/48682/beads-commercial-signal-mmz-en-48682603.pdf?src-supplier=Avnet, ComponentLink3URL=https://datasheet.ciiva.com/48682/beads-commercial-signal-mmz-en-48682603.pdf?src-supplier=Avnet, ComponentLink4Description=https://datasheet.ciiva.com/46634/beads-commercial-signal-mmz-en-46634381.pdf?src-supplier=Digi-Key, ComponentLink4URL=https://datasheet.ciiva.com/46634/beads-commercial-signal-mmz-en-46634381.pdf?src-supplier=Digi-Key, Core Material=Ferrite, Height=0.013inch, Impedance=600R, Lead Free="Lead Free", Length=0.024inch, Manufacturer Part Number=MMZ0603S601CT000, Max DC Current=100mA, Mount="Surface Mount", Packaging="Cut Tape", Pricing 1="1=0.12000, 10=0.09900, 25=0.07680, 50=0.06380, 100=0.05500, 250=0.04400, 500=0.03960, 1000=0.03300, 5000=0.03080 (USD)", REACH SVHC="No SVHC", RoHS=Yes, RoHS Compliant=Yes, Stock 1=1540, Supplier 1=Digi-Key, Width=0.012inch
L5: library part MCS20FC-2R2MMP, "IND SMD 1.5A 2.2uH ±20% 135mΩ"
LED1 LED2 LED3: "Red 625nm 0402 Light Emitting Diodes (LED) RoHS", Manufacturer=TOGIALED, Package=0402, Manufacturer Part No=TJ-S1005SW4TGLC2R-A5
P1 P2: "Test Point ON"
Q1: "TRANS PNP 60V 3A SOT223", Case/Package=SOT-223, Collector Base Voltage (VCBO)=-60V, Collector Emitter Breakdown Voltage=60V, Collector Emitter Saturation Voltage=500mV, Current Rating=-3A, Emitter Base Voltage (VEBO)=-5V, Frequency=75MHz, Manufacturer="ON Semiconductor / Fairchild", Max Collector Current=3A, Max Operating Temperature=150°C, Max Power Dissipation=2W, Min Operating Temperature=-55°C, Package Quantity=1, Supplier Part Number 1=NZT660ACT-ND, Collector Emitter Voltage (VCEO)=60V, ComponentLink1Description=http://www.mouser.com/ds/2/149/NZT660A-191298.pdf?src-supplier=Mouser, ComponentLink1URL=http://www.mouser.com/ds/2/149/NZT660A-191298.pdf?src-supplier=Mouser, ComponentLink2Description=http://www.fairchildsemi.com/datasheets/NZ/NZT660A.pdf?src-supplier=Digi-Key, ComponentLink2URL=http://www.fairchildsemi.com/datasheets/NZ/NZT660A.pdf?src-supplier=Digi-Key, ComponentLink3Description=https://www.fairchildsemi.com/package-drawings/MA/MA04A.pdf?src-supplier=Digi-Key, ComponentLink3URL=https://www.fairchildsemi.com/package-drawings/MA/MA04A.pdf?src-supplier=Digi-Key, ComponentLink4Description=https://www.fairchildsemi.com/datasheets/NZ/NZT660.pdf?src-supplier=Avnet, ComponentLink4URL=https://www.fairchildsemi.com/datasheets/NZ/NZT660.pdf?src-supplier=Avnet, ComponentLink5Description=http://www.fairchildsemi.com/ds/NZ/NZT660.pdf?src-supplier=Avnet, ComponentLink5URL=http://www.fairchildsemi.com/ds/NZ/NZT660.pdf?src-supplier=Avnet, ComponentLink6Description=http://www.farnell.com/datasheets/1794589.pdf?src-supplier=Element14, ComponentLink6URL=http://www.farnell.com/datasheets/1794589.pdf?src-supplier=Element14, ComponentLink7Description=http://www.fairchildsemi.com/ds/NZ/NZT660A.pdf?src-supplier=Future+Electronics, ComponentLink7URL=http://www.fairchildsemi.com/ds/NZ/NZT660A.pdf?src-supplier=Future+Electronics, Element Configuration=Single, Gain Bandwidth Product=75MHz, hFE Min=250, Lead Free="Lead Free", Manufacturer Part Number=NZT660A, Max Breakdown Voltage=60V, Mount="Surface Mount", Number of Elements=1, Number of Pins=4, Packaging="Tape and Reel", Polarity=PNP, Power Dissipation=2W, Pricing 1="1=0.48, 10=0.411, 25=0.3832, 100=0.2847, 250=0.27048, 500=0.22228, 1000=0.18068 (USD)", Radiation Hardening=No, REACH SVHC="No SVHC", Stock 1=9382, Supplier 1=Digi-Key, Transition Frequency=75MHz, Voltage Rating (DC)=-60V, Weight=0.188g
Q2: "Mosfet N-ch 12V 3.2A 3-PIN X2-DFN T/r", Continuous Drain Current (ID)=3.2A, Drain to Source Voltage (Vdss)=12V, Input Capacitance=375pF, Manufacturer=Diodes, Max Operating Temperature=150°C, Max Power Dissipation=500mW, Min Operating Temperature=-55°C, Supplier Part Number 1=DMN1045UFR4-7DIDKR-ND, Category=MOSFETs, ComponentLink1Description=http://www.mouser.com/ds/2/115/DMN1045UFR4-526244.pdf?src-supplier=Mouser, ComponentLink1URL=http://www.mouser.com/ds/2/115/DMN1045UFR4-526244.pdf?src-supplier=Mouser, ComponentLink2Description=https://www.diodes.com/assets/Datasheets/DMN1045UFR4.pdf?src-supplier=Digi-Key, ComponentLink2URL=https://www.diodes.com/assets/Datasheets/DMN1045UFR4.pdf?src-supplier=Digi-Key, Manufacturer Part Number=DMN1045UFR4-7, Mount="Surface Mount", Number of Pins=3, Packaging="Tape and Reel", Pricing 1="1=0.50000, 10=0.37400, 100=0.23280, 500=0.15930, 1000=0.12254 (USD)", Rds On Max=45mR, RoHS=Yes, RoHS Compliant=Yes, Supplier 1=Digi-Key
R1: library part AR02BTC1800, "±0.1% 1/16W Thin Film Resistor 25V ±25ppm/℃ -55℃~+155℃ 180Ω 0402 Chip Resistor - Surface Mount ROHS", Manufacturer="Viking Tech", Package=0402, ComponentLink1Description=LCSC, ComponentLink1URL=https://www.lcsc.com/product-detail/Chip-span-style-background-color-ff0-Resistor-span-Surface-Mount_Viking-Tech-AR02BTC1800_C317910.html, Manufacturer Part No=AR02BTC1800
R2: library part PT0402FR-7W0R22L, "RES 0.22 OHM 1% 1/8W 0402", Case/Package=0402, Manufacturer=Yageo, Max Operating Temperature=155°C, Max Power Dissipation=125mW, Min Operating Temperature=-55°C, Resistance=220mR, Resistor Type="Thick Film", Supplier Part Number 1=1996006P, Temperature Coefficient=200ppm/°C, Tolerance=1%, Category="Chip SMD Resistors", ComponentLink1Description=http://www.mouser.com/ds/2/447/yageodocoutput-1101729.pdf?src-supplier=Mouser, ComponentLink1URL=http://www.mouser.com/ds/2/447/yageodocoutput-1101729.pdf?src-supplier=Mouser, ComponentLink2Description=http://www.yageo.com/documents/recent/PYu-PT-Group_521_RoHS_L-1.pdf?src-supplier=Digi-Key, ComponentLink2URL=http://www.yageo.com/documents/recent/PYu-PT-Group_521_RoHS_L-1.pdf?src-supplier=Digi-Key, Features="Moisture Resistant,Automotive AEC-Q200", Height=0.016inch, Length=0.039inch, Manufacturer Part Number=PT0402FR-7W0R22L, Number of Terminations=2, Packaging="Tape and Reel", Pricing 1="100=0.22700, 250=0.20800, 500=0.19300, 1000=0.16600 (GBP)", RoHS=Yes, Stock 1=7650, Supplier 1=RSComponents, Width=0.02inch
R3: library part RC0603FR-0740K2L, "贴片电阻 40200Ω ± 1.00% 0.1W ± 100ppm/℃ 0603", Case Code (Imperial)=0603, Case Code (Metric)=1608, Manufacturer=Yageo, Max Operating Temperature=155°C, Max Power Dissipation=100mW, Min Operating Temperature=-55°C, Resistance=40.2kR, Resistor Type="Thick Film", Supplier Part Number 1=82AH8157, Temperature Coefficient=100ppm/°C, Tolerance=1%, Voltage Rating=50V, Working Voltage=75V, Case/Package=0603, Category="Chip SMD Resistors", ComponentLink1Description=https://datasheet.ciiva.com/11809/0900766b80f96399-11809261.pdf?src-supplier=RSComponents, ComponentLink1URL=https://datasheet.ciiva.com/11809/0900766b80f96399-11809261.pdf?src-supplier=RSComponents, ComponentLink2Description=https://datasheet.ciiva.com/12555/rc0603-272842-12555385.pdf?src-supplier=Mouser, ComponentLink2URL=https://datasheet.ciiva.com/12555/rc0603-272842-12555385.pdf?src-supplier=Mouser, Construction=Rectangular, Depth=0.8mm, Features="Moisture Resistant", Height=0.45mm, Lead Free="Lead Free", Length=1.6mm, Manufacturer Part Number=RC0603FR-0740K2L, Military Standard=Not, Mount="Surface Mount", Number of Terminations=2, Packaging="Tape and Reel", Power Rating=100mW, Pricing 1="1=0.06100, 10=0.01200, 25=0.00900, 50=0.00700, 100=0.00500 (USD)", RoHS=Yes, RoHS Compliant=Yes, Series=RC, Stock 1=81670, Supplier 1=Newark, Technology="METAL OXIDE FILM", Termination=SMD/SMT, Voltage Rating (DC)=50V, Width=0.8mm
R4: library part AC0603JR-072K2L, "RES SMD 2200Ω ± 5.00% 0.1W ± 100ppm/℃ 0603", Case Code (Imperial)=0603, Case Code (Metric)=1608, Manufacturer=Yageo, Max Operating Temperature=155°C, Max Power Dissipation=100mW, Min Operating Temperature=-55°C, Resistance=2.2kR, Resistor Type="Thick Film", Supplier Part Number 1=1978135, Temperature Coefficient=100ppm/°C, Tolerance=5%, Voltage Rating=50V, Case/Package=0603, Category="Chip SMD Resistors", ComponentLink1Description=http://www.mouser.com/ds/2/447/yageodocoutput-1111992.pdf?src-supplier=Mouser, ComponentLink1URL=http://www.mouser.com/ds/2/447/yageodocoutput-1111992.pdf?src-supplier=Mouser, ComponentLink2Description=http://www.yageo.com/NewPortal/yageodocoutput?fileName=/pdf/R-Chip/PYu-AC_51_RoHS_L_6.pdf&src-supplier=Digi-Key, ComponentLink2URL=http://www.yageo.com/NewPortal/yageodocoutput?fileName=/pdf/R-Chip/PYu-AC_51_RoHS_L_6.pdf&src-supplier=Digi-Key, ComponentLink3Description=https://www.yageo.com/upload/media/product/productsearch/datasheet/rchip/PYu-AC_51_RoHS_L_7.pdf?src-supplier=Digi-Key, ComponentLink3URL=https://www.yageo.com/upload/media/product/productsearch/datasheet/rchip/PYu-AC_51_RoHS_L_7.pdf?src-supplier=Digi-Key, Contact Plating=Tin,Matte, Features="Moisture Resistant,Automotive AEC-Q200", Height=0.022inch, Lead Free="Lead Free", Length=0.063inch, Manufacturer Part Number=AC0603JR-072K2L, Number of Terminations=2, Packaging="Tape and Reel", Power Rating=100mW, Pricing 1="5000=0.00200 (GBP)", Radiation Hardening=No, RoHS=Yes, RoHS Compliant=Yes, Series=AC, Stock 1=9000, Supplier 1=RSComponents, Termination=SMD/SMT, Width=0.8mm
R8: library part 0805W4F680MT5E, "0.068 ±1% 1/4W ±800ppm/°C 0805 Chip Resistor - Surface Mount RoHS", Manufacturer="UNI-ROYAL(Uniroyal Elec)", Package=0805, Manufacturer Part No=0805W4F680MT5E
R9: library part ERJ-2GEJ102X, "RES SMD 1K OHM 5% 1/10W 0402", Case Code (Imperial)=0402, Case Code (Metric)=1005, Manufacturer=Panasonic, Max Operating Temperature=155°C, Max Power Dissipation=100mW, Min Operating Temperature=-55°C, Package Quantity=1, Resistance=1kR, Supplier Part Number 1=P1.0KJCT-ND, Temperature Coefficient=200ppm/°C, Tolerance=5%, Voltage Rating=50V, Case/Package=0402, ComponentLink1Description=https://industrial.panasonic.com/cdbs/www-data/pdf/RDA0000/AOA0000C301.pdf?src-supplier=Future+Electronics, ComponentLink1URL=https://industrial.panasonic.com/cdbs/www-data/pdf/RDA0000/AOA0000C301.pdf?src-supplier=Future+Electronics, ComponentLink2Description=http://www.jameco.com/Jameco/Products/ProdDS/1986781.pdf?src-supplier=Jameco, ComponentLink2URL=http://www.jameco.com/Jameco/Products/ProdDS/1986781.pdf?src-supplier=Jameco, ComponentLink3Description=http://www.farnell.com/datasheets/2059623.pdf?src-supplier=Farnell, ComponentLink3URL=http://www.farnell.com/datasheets/2059623.pdf?src-supplier=Farnell, ComponentLink4Description=http://industrial.panasonic.com/www-data/pdf/AOA0000/AOA0000CE1.pdf?src-supplier=Avnet, ComponentLink4URL=http://industrial.panasonic.com/www-data/pdf/AOA0000/AOA0000CE1.pdf?src-supplier=Avnet, ComponentLink5Description=http://www.alliedelec.com/m/d/51cd0790071e1666bdb9d00c57fcf960.pdf?src-supplier=Allied+Electronics, ComponentLink5URL=http://www.alliedelec.com/m/d/51cd0790071e1666bdb9d00c57fcf960.pdf?src-supplier=Allied+Electronics, ComponentLink6Description=http://industrial.panasonic.com/www-data/pdf/AOA0000/AOA0000CE1.pdf?src-supplier=Avnet+Europe, ComponentLink6URL=http://industrial.panasonic.com/www-data/pdf/AOA0000/AOA0000CE1.pdf?src-supplier=Avnet+Europe, ComponentLink7Description=http://www.farnell.com/datasheets/2059623.pdf?src-supplier=Element14, ComponentLink7URL=http://www.farnell.com/datasheets/2059623.pdf?src-supplier=Element14, ComponentLink8Description=http://industrial.panasonic.com/cdbs/www-data/pdf/RDA0000/AOA0000C301.pdf?src-supplier=Farnell, ComponentLink8URL=http://industrial.panasonic.com/cdbs/www-data/pdf/RDA0000/AOA0000C301.pdf?src-supplier=Farnell, ComponentLink9Description=http://industrial.panasonic.com/www-data/pdf/AOA0000/AOA0000CE1.pdf?src-supplier=Avnet+Asia, ComponentLink9URL=http://industrial.panasonic.com/www-data/pdf/AOA0000/AOA0000CE1.pdf?src-supplier=Avnet+Asia, Composition="Thick Film", Contact Plating=Tin, Depth=0.5mm, Features="Automotive AEC-Q200", Height=0.35mm, Lead Free="Lead Free", Length=1mm, Manufacturer Part Number=ERJ-2GEJ102X, Military Standard=Not, Mount="Surface Mount", Number of Terminations=2, Packaging="Tape and Reel", Power Rating=100mW, Pricing 1="1=0.1, 10=0.032, 100=0.0129, 1000=0.00578, 2500=0.00502, 5000=0.00414 (USD)", Radiation Hardening=No, REACH SVHC="No SVHC", Stock 1=3855795, Supplier 1=Digi-Key, Termination=SMD/SMT, Voltage Rating (DC)=50V, Width=0.02inch, Working Voltage=50V